# Altium PCB adau1979-fpga.PcbDoc (part 6 of 10)
Units mil, origin at the board's own origin, x right, y up, seen from the top; angles counter-clockwise.
Board outline 7874.02 x 9055.12 mil, 4 copper layers (Top Layer, GND, POWER, Bottom Layer), stack 23.756 mil thick; 636 components, 457 nets, 2015 pads, 4184 vias.
Unrouted connection lines stored in the file: 10.
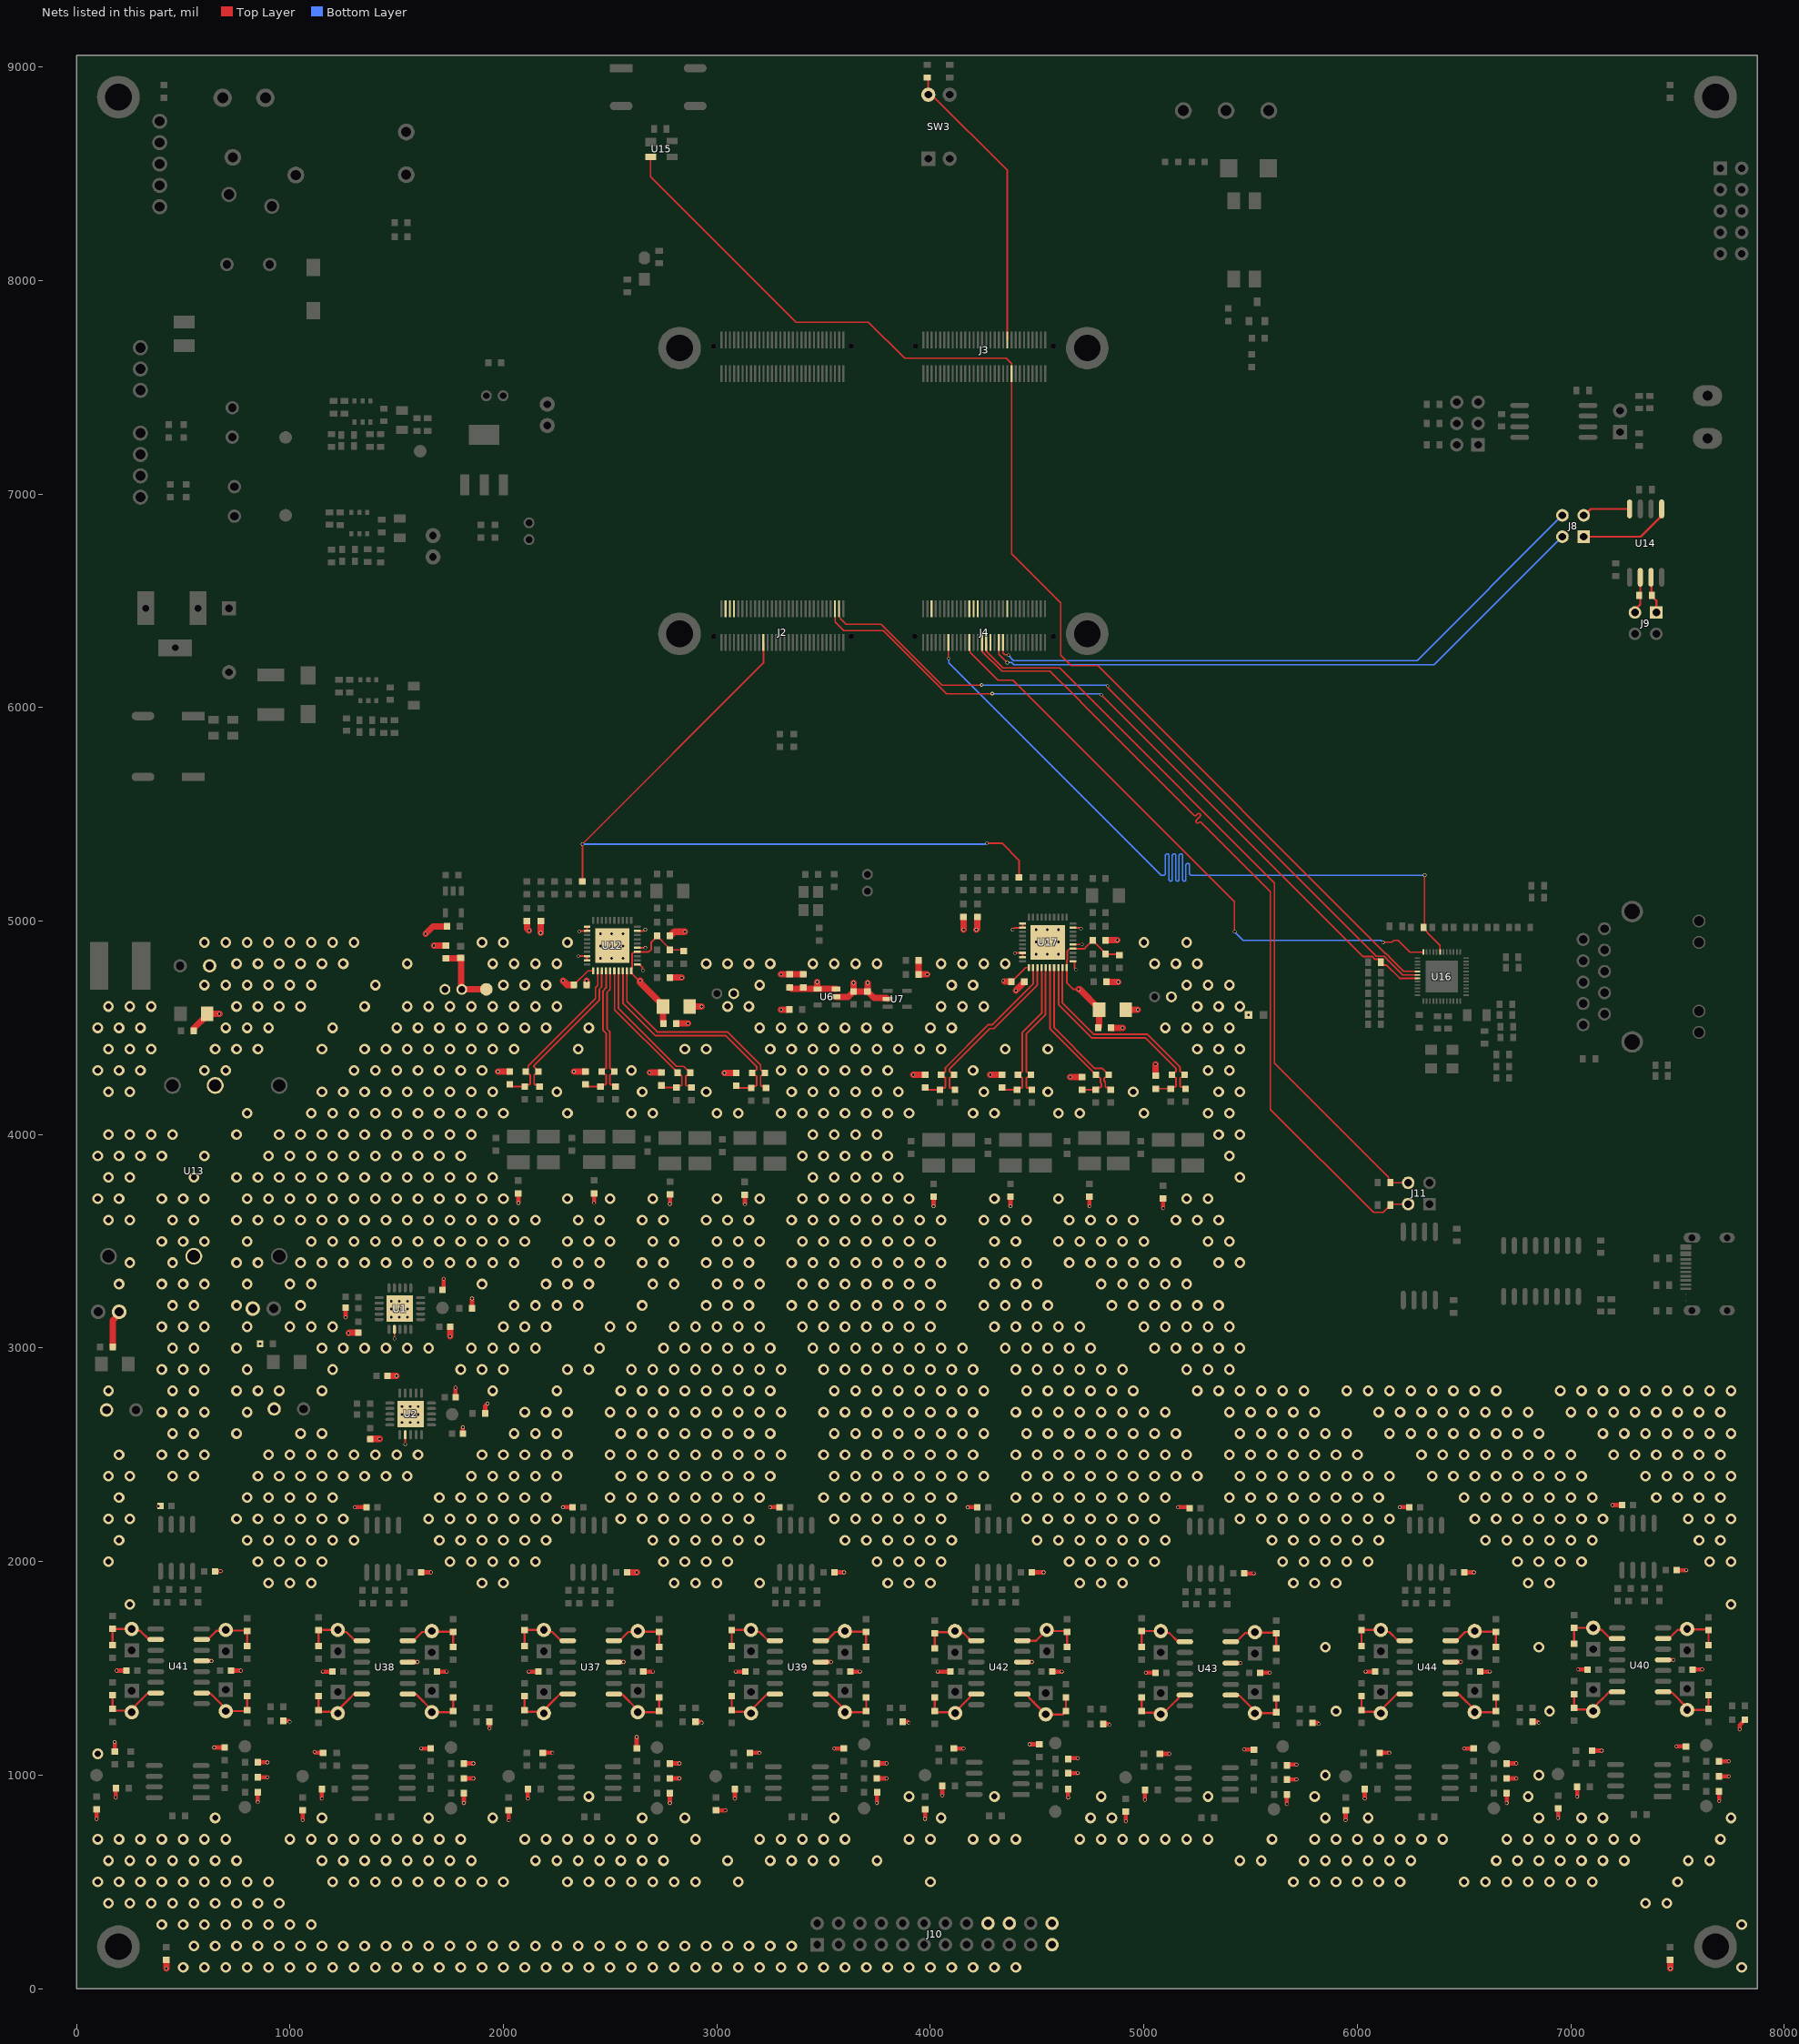
[diagram p5: the nets of this part, all layers, seen from the top]

## Via types
v1: diameter 50, hole 28, Top Layer to Bottom Layer, 3377 vias
v2: diameter 16, hole 12, Top Layer to Bottom Layer, 784 vias
v3: diameter 20, hole 12, Top Layer to Bottom Layer, 14 vias
v4: diameter 16, hole 8, Top Layer to Bottom Layer, 9 vias

## Nets (pads, with @x,y where several pads share a name; then routed paths per layer and width w, separated by ;. In a path a pad name is that pad's centre, name@x,y a point inside that pad or via, vN(x,y) a via of type N, cw(c..) or ccw(c..) an arc to the next point about the centre after c; other vN are vias at no path point) (continued)
AGND: C1.2 C2.2 C3.2 C5.2 C6.2 C7.2 C30.2 C31.1 C32.1 C33.1 C34.1 C35.1 C36.1 C39.1 C40.2 C41.1 C60.1 C61.2 C62.2 C63.1 C65.2 C66.1 C67.1 C68.1 C69.2 C70.2 C71.2 C72.1 C81.1 C82.1 C87.2 C88.2 C100.2 C112.2 C120.2 C121.1 C126.2 C131.2 C139.2 C140.2 C141.2 C142.2 C143.2 C144.2 C145.2 C146.2 C147.2 C148.2 C149.2 C150.2 C151.2 C152.2 C153.2 C154.2 C155.2 C156.1 C157.1 C158.1 C159.1 C160.1 C161.1 C162.1 C163.1 C164.1 C165.1 C166.1 C167.1 C168.1 C169.1 C170.1 C171.1 C180.1 C181.1 C182.1 C183.1 C184.1 C185.1 C186.1 C187.1 C188.1 C189.1 C190.1 C191.1 C192.1 C193.1 C194.1 C195.1 C196.1 C197.1 C198.1 C199.1 C200.1 C201.1 C202.1 C203.1 C204.1 C205.1 C206.1 C207.1 C208.1 C209.1 C210.1 C211.1 J10.18 J10.20 J10.23 J10.24 L6.1 R4.1 R6.1 R7.2 R8.2 R28.1 R29.1 R34.1 R35.1 R48.1 R50.1 R53.2 R54.1 R58.1 R59.1 R70.1 R71.1 R80.1 R85.1 R98.1 R100.1 R102.2 R103.1 R108.1 R109.1 R133.1 R134.2 R136.1 R137.1 R138.2 R140.2 R142.1 R143.1 R144.1 R145.2 R146.1 R147.2 R149.2 R153.2 R155.1 R156.2 R218.1 R228.1 R230.1 R232.1 R235.1 R236.1 R237.1 R243.1 R248.1 R254.1 R256.1 R258.1 R261.1 R263.1 R265.1 R267.1 U1.7 U1.21 U2.7 U2.21 U6.2 U7.2 U12.1 U12.5 U12.9 U12.21 U12.22 U12.28 U12.29 U12.41 U13.2 U13.5 U17.1 U17.5 U17.9 U17.21 U17.22 U17.28 U17.29 U17.41 U37.5 U38.5 U39.5 U40.5 U41.5 U42.5 U43.5 U44.5 | length 8180.4
  Top Layer w8: U1.7@1489.41,3087.81 1489.7,3087.51 1489.7,3045.3 v2(1490,3045) ; v2(1540,2550) U2.7@1540,2594.33 ; v2(2350,4835) 2350.4,4835.4 2390.9,4835.4 2391.9,4834.4 U12.29@2391.9,4814.7 ; v2(2355,4950) 2357.16,4950 2361.06,4953.9 U12.22@2391.9,4953.9 U12.21@2391.9,4973.6 ; U12.1@2628.1,4796.5 2638.35,4796.5 2652.57,4782.28 2652.57,4770.63 v2(2654.1,4769.1) ; U12.5@2628.1,4875.2 2628.2,4875.1 2664.9,4875.1 v2(2665,4875) ; U12.9@2628.1,4953.9 2656.74,4953.9 2662.84,4960 v2(2665,4960) ; v2(4385,4959.87) 4387.16,4959.87 4396.15,4968.85 4431.9,4968.85 U17.21@4431.9,4988.6 ; v2(4395,4850) 4395.4,4850.4 4431.5,4850.4 U17.28@4431.9,4850.8 U17.29@4431.9,4831.1 ; U17.9@4668.1,4968.9 4698.94,4968.9 4702.84,4965 v2(4705,4965) ; U17.5@4669.7,4890.1 4709.9,4890.1 v2(4710,4890) ; U17.1@4675,4810 4675,4781.36 4681.1,4775.26 v2(4681.1,4773.1)
  Top Layer w20: v2(95,794.92) R267.1@95,840 ; R155.1@179.41,1109.92 v2(179.41,1155) ; v2(184.48,894.92) C154.2@184.48,940 ; v2(188.73,1489.99) C202.1@233.81,1489.99 ; v2(384,2259.99) C194.1@393.81,2259.99 ; U41.5@587.11,1535 v2(632.18,1535) ; v2(645,1130) 645.08,1129.92 C169.1@694.41,1129.92 ; C195.1@650,1955 v2(675.59,1955) ; C203.1@725,1490 v2(770.08,1490) ; R153.2@849.25,990 v2(894.33,990) ; v2(849.33,874.92) C147.2@849.33,920 ; C168.1@849.33,1060 v2(894.41,1060) ; R243.1@969.92,1255 v2@994.25,1255 ; v2(1060,789.92) R261.1@1060,835 ; v2(1115,1110) 1120.08,1104.92 R146.1@1144.41,1104.92 ; v2(1149.48,889.92) C155.2@1149.48,935 ; v2(1153.73,1484.99) C198.1@1198.81,1484.99 ; v2(1260.58,3143.72) C2.2@1260.58,3188.8 ; v2(1304.92,2255) C188.1@1350,2255 ; U38.5@1552.11,1530 v2(1597.18,1530) ; v2(1615,1125) 1615.08,1124.92 C171.1@1659.41,1124.92 ; C189.1@1615,1950 v2(1660.08,1950) ; C199.1@1690,1485 v2(1735.08,1485) ; C3.2@1720,3280 v2(1720,3325.08) ; C7.2@1775.59,2770 v2(1775.59,2815.08) ; C6.2@1810,2600 v2(1810,2629.26) ; v2(1814.33,869.92) C148.2@1814.33,915 ; C170.1@1814.33,1055 v2(1859.41,1055) ; R156.2@1814.92,985 v2(1860,985) ; C67.1@1852.89,3186.86 v2(1852.89,3231.94) ; C62.2@1914.92,2695 1914.92,2700.67 1915,2700.75 1915,2730 v2(1925,2740) ; v2(1934.92,1219) R235.1@1934.92,1250 ; v2(2025,789.92) R263.1@2025,835 ; v2(2070,3680) R28.1@2070,3725.08 ; v2(2114.48,889.92) C152.2@2114.48,935 ; v2(2118.73,1484.99) C196.1@2163.81,1484.99 ; R143.1@2184.41,1104.92 v2(2229.48,1104.92) ; v2(2278.73,2254.99) C190.1@2323.81,2254.99 ; v2(2425,3680.08) R34.1@2425,3725.16 ; U37.5@2517.11,1530 v2(2562.18,1530) ; C167.1@2624.41,1124.92 2624.41,1170 v2(2624.41,1179) ; C197.1@2655,1485 v2(2700.08,1485) ; R147.2@2779.25,985 v2(2824.33,985) ; v2(2779.33,869.92) C144.2@2779.33,915 ; C166.1@2779.33,1055 v2(2824.41,1055) ; v2(2780,3675) R48.1@2780,3720.08 ; R236.1@2899.92,1250 v2@2924.25,1250 ; R265.1@2995,835 v2(3040.08,835) ; v2(3084.48,889.92) C153.2@3084.48,935 ; v2(3088.73,1484.99) C200.1@3133.81,1484.99 ; v2(3130.74,3673.62) R58.1@3130.74,3718.7 ; R144.1@3154.41,1104.92 v2(3199.48,1104.92) ; v2(3248.73,2254.99) C192.1@3293.81,2254.99 ; U39.5@3497.51,1530 v2(3535,1530) ; v2(3549.33,1124.92) C165.1@3594.41,1124.92 ; C193.1@3550,1950 v2(3595.08,1950) ; C201.1@3625,1485 v2(3670.08,1485) ; R149.2@3749.25,985 v2(3794.33,985) ; v2(3749.33,869.92) C145.2@3749.33,915 ; C164.1@3749.33,1055 v2(3794.41,1055) ; R237.1@3869.92,1250 v2@3894.25,1250 ; v2(3975,795) R254.1@3975,840.08 ; v2(4015,3665) R70.1@4015,3710.08 ; v2(4034.33,1485) C204.1@4079.41,1485 ; v2(4055.08,904.92) C146.2@4055.08,950 ; R133.1@4110,1124.92 v2(4155.08,1124.92) ; v2(4174.33,2255) C182.1@4219.41,2255 ; v2(4375,3665) R80.1@4375,3710.08 ; U42.5@4440.8,1530 v2(4475,1530) ; v2(4464.92,1144.92) C156.1@4510,1144.92 ; C183.1@4485,1950 v2(4530.08,1950) ; C205.1@4570.59,1485 v2(4615.67,1485) ; R134.2@4644.92,1010 v2(4690,1010) ; v2(4645,894.92) C140.2@4645,940 ; C157.1@4645,1080 v2(4690.08,1080) ; v2(4745,3665) R98.1@4745,3710.08 ; R228.1@4809.92,1240 v2@4834.25,1240 ; v2(4915,784.92) R248.1@4915,830 ; v2(5004.48,884.92) C149.2@5004.48,930 ; v2(5008.73,1479.99) C206.1@5053.81,1479.99 ; R136.1@5074.41,1099.92 v2(5119.48,1099.92) ; v2(5090,3655) R108.1@5090,3700.08 ; v2(5159.92,2255) C180.1@5205,2255 ; U43.5@5407.11,1525 v2(5452.19,1525) ; v2(5469.92,1119.92) C158.1@5515,1119.92 ; C181.1@5470,1945 v2(5515.08,1945) ; C207.1@5545,1480 v2(5590.08,1480) ; R138.2@5669.25,980 v2(5714.33,980) ; v2(5669.33,864.92) C141.2@5669.33,910 ; C159.1@5669.33,1050 v2(5714.41,1050) ; R218.1@5789.92,1245 v2@5814.25,1245 ; v2(5945,789.92) R256.1@5945,835 ; v2(6034.48,889.92) C150.2@6034.48,935 ; v2(6038.73,1484.99) C210.1@6083.81,1484.99 ; R137.1@6104.41,1104.92 v2(6149.48,1104.92) ; v2(6198.73,2254.99) C184.1@6243.81,2254.99 ; U44.5@6447.51,1530 v2(6485,1530) ; v2(6499.33,1124.92) C161.1@6544.41,1124.92 ; C185.1@6500,1950 v2(6545.08,1950) ; C211.1@6575,1485 v2(6620.08,1485) ; R140.2@6699.25,985 v2(6744.33,985) ; v2(6699.33,869.92) C142.2@6699.33,915 ; C160.1@6699.33,1055 v2(6744.41,1055) ; R230.1@6819.92,1250 v2@6844.25,1250 ; v2(6940,799.92) R258.1@6940,845 ; v2(7029.48,899.92) C151.2@7029.48,945 ; v2(7033.73,1494.99) C208.1@7078.81,1494.99 ; R142.1@7099.41,1114.92 v2(7144.48,1114.92) ; v2(7193.73,2264.99) C186.1@7238.81,2264.99 ; U40.5@7442.51,1540 v2(7480,1540) ; v2(7494.33,1134.92) C163.1@7539.41,1134.92 ; C187.1@7495,1960 v2(7540.08,1960) ; C209.1@7570,1495 v2(7615.08,1495) ; R145.2@7694.25,995 v2(7739.33,995) ; v2(7694.33,879.92) C143.2@7694.33,925 ; C162.1@7694.33,1065 v2(7739.41,1065) ; v2(7790,1215) 7790,1234.29 7814.92,1259.21 R232.1@7814.92,1260
  Top Layer w30: C68.1@169.92,3005 169.92,3129.4 200,3159.48 C65.2@200,3170 ; v2(420.76,95.08) R7.2@420.76,126.61 ; C71.2@549.92,4485 549.96,4485.04 549.96,4497.51 612.7,4560.25 C72.1@612.7,4565 v2(670,4565) ; v2(1275,3070) 1277.28,3072.28 R4.1@1320,3072.28 ; R6.1@1375,2574.41 1375.6,2575 v2(1420,2575) ; C5.2@1456.18,2870 v2(1500,2870) ; v2(1635,4940) 1670,4975 C39.1@1735.08,4975 ; v2(1674.92,4884.92) C41.1@1730,4884.92 ; v2(1750,3055) 1750,3099.41 C1.2@1750.59,3100 ; v2(1974.92,4294.92) R29.1@2030,4294.92 ; R53.2@2110,5000.08 2110.71,5000.08 2110.75,5000.04 2110.75,4964.25 v2(2120,4955) ; v2(2175,4945) R54.1@2175,5000.08 ; v2(2329.92,4295) R35.1@2385,4295 ; C66.1@2389.92,4700 v2(2389.92,4720) ; C191.1@2580,1950 v2(2625.08,1950) ; v2(2684.92,4289.92) R50.1@2740,4289.92 ; C87.2@2779.92,4735 v2(2835,4735) ; C100.2@2779.92,4930 2779.92,4930.71 2779.96,4930.75 2780.67,4930.75 2799.92,4950 v2(2850,4950) ; C81.1@2809.92,4520 v2(2865,4520) ; C82.1@2873,4600 v2(2928.08,4600) ; v2(3035.66,4288.54) R59.1@3090.74,4288.54 ; v2(3300,4749.92) C34.1@3331.54,4749.92 ; v2(3300.08,4585) C30.2@3331.61,4585 ; C34.1@3340,4749.92 C33.1@3405,4749.92 ; U6.2@3558.31,4645 3614.51,4645 3639.44,4669.92 C31.1@3705,4669.92 3705.71,4669.92 3735.28,4640.35 3794.23,4640.35 U7.2@3799.58,4635 ; C32.1@3640,4678.39 v2(3640,4709.92) ; C31.1@3705.71,4678.39 v2(3705.71,4709.92) ; v2(3919.92,4279.92) R71.1@3975,4279.92 ; C36.1@3944.92,4750 C35.1@3944.92,4815 ; C36.1@3953.39,4750 v2(3984.92,4750) ; v2(4155,4959.87) R102.2@4155,5020.04 ; v2(4215,4959.87) 4220,4964.87 R103.1@4220,5020.08 ; v2(4279.92,4279.92) R85.1@4335,4279.92 ; v2(4400,4675) 4400.63,4675 4439.92,4714.29 C112.2@4439.92,4715 ; v2(4654.92,4269.92) R100.1@4710,4269.92 ; C139.2@4819.92,4910 v2(4875,4910) ; C126.2@4824.92,4715 v2(4880,4715) ; C120.2@4844.92,4500 v2(4900,4500) ; C121.1@4915.7,4585 v2(4970.78,4585) ; R109.1@5055,4274.92 v2(5055,4330) ; v2(7465,95.08) R8.2@7465,126.61
  other v1: 500,100 600,100 700,100 800,100 900,100 1000,100 1100,100 1200,100 1300,100 1400,100 1500,100 1600,100 1700,100 1800,100 1900,100 2000,100 2100,100 2200,100 2300,100 2400,100 2500,100 2600,100 2700,100 2800,100 2900,100 3000,100 3100,100 3200,100 3300,100 3400,100 3500,100 3600,100 3700,100 3800,100 3900,100 4000,100 4100,100 4200,100 4300,100 4400,100 7800,100 550,200 650,200 750,200 850,200 950,200 1050,200 1150,200 1250,200 1350,200 1450,200 1550,200 1650,200 1750,200 1850,200 1950,200 2050,200 2150,200 2250,200 2350,200 2450,200 2550,200 2650,200 2750,200 2850,200 2950,200 3050,200 3150,200 3250,200 3350,200 400,300 500,300 600,300 700,300 800,300 900,300 1000,300 1100,300 7800,300 150,400 250,400 350,400 450,400 550,400 650,400 750,400 850,400 950,400 7350,400 7450,400 100,500 200,500 300,500 400,500 500,500 600,500 700,500 800,500 900,500 1200,500 1300,500 1400,500 1500,500 1600,500 1700,500 1800,500 1900,500 2000,500 2300,500 2400,500 2500,500 2600,500 2700,500 2800,500 2900,500 3100,500 4000,500 5700,500 5800,500 5900,500 6000,500 6100,500 6200,500 6500,500 6600,500 6700,500 6800,500 6900,500 7000,500 7100,500 7500,500 150,600 250,600 350,600 450,600 550,600 650,600 750,600 1150,600 1250,600 1350,600 1450,600 1550,600 1650,600 1750,600 1850,600 2150,600 2250,600 2350,600 2450,600 2550,600 2650,600 2750,600 3050,600 3250,600 3350,600 3450,600 3550,600 3750,600 5450,600 5550,600 5750,600 5850,600 5950,600 6050,600 6150,600 6250,600 6650,600 6750,600 6850,600 6950,600 7050,600 7150,600 7250,600 7550,600 7650,600 100,700 200,700 300,700 400,700 500,700 600,700 700,700 1000,700 1100,700 1200,700 1300,700 1400,700 1500,700 1600,700 1700,700 1800,700 2100,700 2200,700 2300,700 2400,700 2500,700 2600,700 2700,700 2900,700 3200,700 3300,700 3400,700 3500,700 3600,700 3900,700 4000,700 4200,700 4300,700 4400,700 4700,700 4800,700 4900,700 5000,700 5100,700 5200,700 5300,700 5600,700 5800,700 5900,700 6000,700 6100,700 6200,700 6300,700 6400,700 6700,700 6800,700 6900,700 7000,700 7100,700 7200,700 7300,700 7700,700 650,800 1150,800 1650,800 1950,800 2650,800 2850,800 3550,800 4050,800 4750,800 4850,800 5850,800 6050,800 6850,800 7050,800 7150,800 7750,800 2400,900 3900,900 4300,900 4800,900 5300,900 5800,900 6800,900 5850,1000 6850,1000 100,1100 5900,1300 6900,1300 5850,1600 6850,1600 250,1800 7750,1800 900,1900 1000,1900 1100,1900 1900,1900 2000,1900 2800,1900 2900,1900 3000,1900 3200,1900 3800,1900 3900,1900 4000,1900 4700,1900 4800,1900 4900,1900 5700,1900 5800,1900 5900,1900 6800,1900 6900,1900 150,2000 850,2000 950,2000 1050,2000 1150,2000 1750,2000 1850,2000 1950,2000 2050,2000 2150,2000 2750,2000 2850,2000 2950,2000 3050,2000 3750,2000 3850,2000 3950,2000 4050,2000 4650,2000 4750,2000 4850,2000 4950,2000 5050,2000 5650,2000 5750,2000 5850,2000 5950,2000 6050,2000 6750,2000 6850,2000 6950,2000 7050,2000 7650,2000 7750,2000 200,2100 800,2100 900,2100 1000,2100 1100,2100 1200,2100 1300,2100 1700,2100 1800,2100 1900,2100 2000,2100 2100,2100 2200,2100 2700,2100 2800,2100 2900,2100 3000,2100 3100,2100 3200,2100 3600,2100 3700,2100 3800,2100 3900,2100 4000,2100 4100,2100 4500,2100 4600,2100 4700,2100 4800,2100 4900,2100 5000,2100 5100,2100 5600,2100 5700,2100 5800,2100 5900,2100 6000,2100 6100,2100 6600,2100 6700,2100 6800,2100 6900,2100 7000,2100 7100,2100 7600,2100 7700,2100 150,2200 250,2200 750,2200 850,2200 950,2200 1050,2200 1150,2200 1250,2200 1650,2200 1750,2200 1850,2200 1950,2200 2050,2200 2150,2200 2250,2200 2550,2200 2650,2200 2750,2200 2850,2200 2950,2200 3050,2200 3150,2200 3550,2200 3650,2200 3750,2200 3850,2200 3950,2200 4050,2200 4450,2200 4550,2200 4650,2200 4750,2200 4850,2200 4950,2200 5050,2200 5450,2200 5550,2200 5650,2200 5750,2200 5850,2200 5950,2200 6050,2200 6150,2200 6550,2200 6650,2200 6750,2200 6850,2200 6950,2200 7050,2200 7150,2200 7550,2200 7650,2200 7750,2200 200,2300 800,2300 900,2300 1000,2300 1100,2300 1200,2300 1700,2300 1800,2300 1900,2300 2000,2300 2100,2300 2200,2300 2500,2300 2600,2300 2700,2300 2800,2300 2900,2300 3000,2300 3100,2300 3200,2300 3500,2300 3600,2300 3700,2300 3800,2300 3900,2300 4000,2300 4100,2300 4400,2300 4500,2300 4600,2300 4700,2300 4800,2300 4900,2300 5000,2300 5100,2300 5400,2300 5500,2300 5600,2300 5700,2300 5800,2300 5900,2300 6000,2300 6100,2300 6500,2300 6600,2300 6700,2300 6800,2300 6900,2300 7000,2300 7100,2300 7400,2300 7500,2300 7600,2300 7700,2300 150,2400 250,2400 450,2400 550,2400 850,2400 950,2400 1050,2400 1150,2400 1250,2400 1350,2400 1450,2400 1550,2400 1850,2400 1950,2400 2050,2400 2150,2400 2250,2400 2550,2400 2650,2400 2750,2400 2850,2400 2950,2400 3050,2400 3150,2400 3250,2400 3550,2400 3650,2400 3750,2400 3850,2400 3950,2400 4050,2400 4150,2400 4250,2400 4450,2400 4550,2400 4650,2400 4750,2400 4850,2400 4950,2400 5050,2400 5150,2400 5250,2400 5450,2400 5550,2400 5650,2400 5750,2400 5850,2400 5950,2400 6050,2400 6150,2400 6350,2400 6450,2400 6550,2400 6650,2400 6750,2400 6850,2400 6950,2400 7050,2400 7350,2400 7450,2400 7550,2400 7650,2400 7750,2400 200,2500 400,2500 500,2500 600,2500 900,2500 1000,2500 1100,2500 1200,2500 1300,2500 1400,2500 1500,2500 1600,2500 1900,2500 2000,2500 2100,2500 2200,2500 2300,2500 2500,2500 2600,2500 2700,2500 2800,2500 2900,2500 3000,2500 3100,2500 3200,2500 3300,2500 3500,2500 3600,2500 3700,2500 3800,2500 3900,2500 4000,2500 4100,2500 4200,2500 4400,2500 4500,2500 4600,2500 4700,2500 4800,2500 4900,2500 5000,2500 5100,2500 5200,2500 5400,2500 5500,2500 5600,2500 5700,2500 5800,2500 5900,2500 6000,2500 6300,2500 6400,2500 6500,2500 6600,2500 6700,2500 6800,2500 6900,2500 7000,2500 7200,2500 7300,2500 7400,2500 7500,2500 7600,2500 7700,2500 450,2600 550,2600 750,2600 1050,2600 1150,2600 2050,2600 2150,2600 2250,2600 2550,2600 2650,2600 2750,2600 2850,2600 2950,2600 3050,2600 3150,2600 3250,2600 3550,2600 3650,2600 3750,2600 3850,2600 3950,2600 4050,2600 4150,2600 4250,2600 4450,2600 4550,2600 4650,2600 4750,2600 4850,2600 4950,2600 5050,2600 5150,2600 5450,2600 5550,2600 5650,2600 5750,2600 5850,2600 5950,2600 6150,2600 6250,2600 6350,2600 6450,2600 6550,2600 6650,2600 6750,2600 6850,2600 7150,2600 7250,2600 7350,2600 7450,2600 7550,2600 7650,2600 7750,2600 400,2700 500,2700 600,2700 800,2700 2100,2700 2200,2700 2300,2700 2500,2700 2600,2700 2700,2700 2800,2700 2900,2700 3000,2700 3100,2700 3200,2700 3300,2700 3500,2700 3600,2700 3700,2700 3800,2700 3900,2700 4000,2700 4100,2700 4200,2700 4400,2700 4500,2700 4600,2700 4700,2700 4800,2700 4900,2700 5000,2700 5100,2700 5400,2700 5500,2700 5600,2700 5700,2700 5800,2700 6100,2700 6200,2700 6300,2700 6400,2700 6500,2700 6600,2700 6700,2700 6800,2700 7000,2700 7100,2700 7200,2700 7300,2700 7400,2700 7500,2700 7600,2700 7700,2700 150,2800 450,2800 550,2800 750,2800 850,2800 950,2800 1150,2800 1950,2800 2250,2800 2550,2800 2650,2800 2750,2800 2850,2800 2950,2800 3050,2800 3150,2800 3250,2800 3550,2800 3650,2800 3750,2800 3850,2800 3950,2800 4050,2800 4150,2800 4250,2800 4450,2800 4550,2800 4650,2800 4750,2800 4850,2800 4950,2800 5250,2800 5350,2800 5450,2800 5550,2800 5650,2800 5750,2800 5950,2800 6050,2800 6150,2800 6250,2800 6350,2800 6450,2800 6550,2800 6650,2800 6950,2800 7050,2800 7150,2800 7250,2800 7350,2800 7450,2800 7550,2800 7650,2800 7750,2800 400,2900 500,2900 600,2900 800,2900 1200,2900 1800,2900 1900,2900 2000,2900 2300,2900 2400,2900 2600,2900 2700,2900 2800,2900 2900,2900 3000,2900 3100,2900 3200,2900 3300,2900 3500,2900 3600,2900 3700,2900 3800,2900 3900,2900 4000,2900 4100,2900 4200,2900 4400,2900 4500,2900 4600,2900 4700,2900 4800,2900 4900,2900 5200,2900 5300,2900 5400,2900 450,3000 550,3000 750,3000 1150,3000 1250,3000 1350,3000 1450,3000 1550,3000 1650,3000 1850,3000 1950,3000 2050,3000 2150,3000 2450,3000 2750,3000 2850,3000 2950,3000 3050,3000 3150,3000 3250,3000 3450,3000 3550,3000 3650,3000 3750,3000 3850,3000 3950,3000 4050,3000 4150,3000 4350,3000 4450,3000 4550,3000 4650,3000 4750,3000 5050,3000 5150,3000 5250,3000 5350,3000 5450,3000 400,3100 500,3100 600,3100 800,3100 1000,3100 1100,3100 1200,3100 2000,3100 2100,3100 2200,3100 2500,3100 2600,3100 2800,3100 2900,3100 3000,3100 3100,3100 3200,3100 3400,3100 3500,3100 3600,3100 3700,3100 3800,3100 3900,3100 4000,3100 4300,3100 4400,3100 4500,3100 4600,3100 4700,3100 5000,3100 5100,3100 5200,3100 5300,3100 5400,3100 450,3200 550,3200 750,3200 1050,3200 2050,3200 2150,3200 2250,3200 2350,3200 2650,3200 2950,3200 3050,3200 3150,3200 3350,3200 3450,3200 3550,3200 3650,3200 3750,3200 3850,3200 3950,3200 4050,3200 4250,3200 4350,3200 4450,3200 4550,3200 4850,3200 4950,3200 5050,3200 5150,3200 5250,3200 5350,3200 200,3300 400,3300 500,3300 600,3300 800,3300 1000,3300 1100,3300 1900,3300 2200,3300 2300,3300 2400,3300 2700,3300 2800,3300 3000,3300 3100,3300 3200,3300 3400,3300 3500,3300 3600,3300 3700,3300 3800,3300 3900,3300 4000,3300 4300,3300 4400,3300 4500,3300 4800,3300 4900,3300 5000,3300 5100,3300 5200,3300 250,3400 450,3400 750,3400 850,3400 1050,3400 1150,3400 1250,3400 1350,3400 1450,3400 1550,3400 1650,3400 1750,3400 1850,3400 1950,3400 2050,3400 2250,3400 2350,3400 2450,3400 2650,3400 2750,3400 2950,3400 3050,3400 3150,3400 3350,3400 3450,3400 3550,3400 3650,3400 3750,3400 3850,3400 3950,3400 4050,3400 4250,3400 4350,3400 4450,3400 4650,3400 4750,3400 4850,3400 4950,3400 5050,3400 5150,3400 5350,3400 5450,3400 400,3500 500,3500 600,3500 800,3500 1100,3500 1200,3500 1300,3500 1400,3500 1500,3500 1600,3500 1700,3500 1800,3500 1900,3500 2000,3500 2100,3500 2300,3500 2400,3500 2500,3500 2700,3500 2800,3500 3000,3500 3100,3500 3200,3500 3400,3500 3500,3500 3600,3500 3700,3500 3800,3500 3900,3500 4000,3500 4300,3500 4400,3500 4600,3500 4700,3500 4800,3500 4900,3500 5000,3500 5300,3500 5400,3500 150,3600 250,3600 450,3600 550,3600 750,3600 850,3600 950,3600 1050,3600 1150,3600 1250,3600 1350,3600 1450,3600 1550,3600 1650,3600 1750,3600 1850,3600 1950,3600 2050,3600 2150,3600 2350,3600 2450,3600 2650,3600 2750,3600 2950,3600 3050,3600 3150,3600 3350,3600 3450,3600 3550,3600 3650,3600 3750,3600 3850,3600 3950,3600 4050,3600 4250,3600 4350,3600 4450,3600 4650,3600 4750,3600 4850,3600 4950,3600 5150,3600 5250,3600 5350,3600 100,3700 200,3700 400,3700 500,3700 600,3700 800,3700 900,3700 1000,3700 1100,3700 1200,3700 1300,3700 1400,3700 1500,3700 1600,3700 1700,3700 1800,3700 1900,3700 2000,3700 2300,3700 2500,3700 2700,3700 3000,3700 3200,3700 3400,3700 3500,3700 3600,3700 3700,3700 3800,3700 3900,3700 4300,3700 4600,3700 5200,3700 5300,3700 150,3800 250,3800 550,3800 750,3800 850,3800 950,3800 1050,3800 1150,3800 1250,3800 1350,3800 1450,3800 1550,3800 1650,3800 1750,3800 1850,3800 1950,3800 3450,3800 3550,3800 3650,3800 3750,3800 3850,3800 5450,3800 100,3900 200,3900 300,3900 400,3900 600,3900 900,3900 1000,3900 1100,3900 1200,3900 1300,3900 1400,3900 1500,3900 1600,3900 1700,3900 1800,3900 3400,3900 3500,3900 3600,3900 3700,3900 3800,3900 5400,3900 150,4000 250,4000 350,4000 450,4000 750,4000 950,4000 1050,4000 1150,4000 1250,4000 1350,4000 1450,4000 1550,4000 1650,4000 1750,4000 1850,4000 3450,4000 3550,4000 3650,4000 3750,4000 5350,4000 5450,4000 800,4100 1100,4100 1200,4100 1300,4100 1400,4100 1500,4100 1600,4100 1700,4100 1800,4100 1900,4100 2000,4100 2300,4100 2600,4100 2700,4100 3000,4100 3100,4100 3300,4100 3400,4100 3500,4100 3600,4100 3700,4100 3800,4100 3900,4100 4200,4100 4300,4100 4600,4100 4700,4100 5000,4100 5300,4100 5400,4100 150,4200 250,4200 1150,4200 1250,4200 1350,4200 1450,4200 1550,4200 1650,4200 1750,4200 1850,4200 1950,4200 2250,4200 2650,4200 2950,4200 3350,4200 3450,4200 3550,4200 3650,4200 3750,4200 3850,4200 4250,4200 4550,4200 4950,4200 5350,4200 5450,4200 100,4300 200,4300 300,4300 600,4300 700,4300 1300,4300 1400,4300 1500,4300 1600,4300 1700,4300 1800,4300 1900,4300 2600,4300 3300,4300 3400,4300 3500,4300 3600,4300 3700,4300 3800,4300 4200,4300 5300,4300 5400,4300 150,4400 250,4400 350,4400 650,4400 750,4400 850,4400 1150,4400 1350,4400 1450,4400 1550,4400 1650,4400 1750,4400 1850,4400 1950,4400 2050,4400 2350,4400 2850,4400 2950,4400 3250,4400 3350,4400 3450,4400 3550,4400 3650,4400 3750,4400 3850,4400 3950,4400 4050,4400 4350,4400 4550,4400 5250,4400 5350,4400 5450,4400 100,4500 200,4500 300,4500 700,4500 800,4500 900,4500 1200,4500 1500,4500 1600,4500 1700,4500 1800,4500 1900,4500 2000,4500 2100,4500 2200,4500 2400,4500 3200,4500 3300,4500 3400,4500 3500,4500 3600,4500 3700,4500 3800,4500 4000,4500 4100,4500 5100,4500 5200,4500 5300,4500 5400,4500 150,4600 250,4600 350,4600 750,4600 850,4600 950,4600 1050,4600 1350,4600 1550,4600 1650,4600 1750,4600 1850,4600 1950,4600 2050,4600 2150,4600 2250,4600 3050,4600 3150,4600 4050,4600 4150,4600 4250,4600 5250,4600 5350,4600 5450,4600 600,4700 700,4700 800,4700 900,4700 1000,4700 1100,4700 1400,4700 2000,4700 2100,4700 2200,4700 3200,4700 4100,4700 4200,4700 5200,4700 5300,4700 5400,4700 750,4800 850,4800 950,4800 1050,4800 1150,4800 1250,4800 1550,4800 1950,4800 2050,4800 2150,4800 2250,4800 2950,4800 3050,4800 3150,4800 3250,4800 3450,4800 3550,4800 3650,4800 3750,4800 4050,4800 4150,4800 4250,4800 4350,4800 5050,4800 5150,4800 5250,4800 600,4900 700,4900 800,4900 900,4900 1000,4900 1100,4900 1200,4900 1300,4900 1900,4900 2000,4900 2300,4900 5000,4900 5200,4900
  other v2: 4839.33,1234.92 5819.33,1239.92 2929.33,1244.92 3899.33,1244.92 6849.33,1244.92 999.33,1249.92 1525.59,2651.52 1563.09,2651.52 1600.59,2651.52 1525.59,2689.02 1563.09,2689.02 1600.59,2689.02 1525.59,2726.52 1563.09,2726.52 1600.59,2726.52 860.08,3020 1475,3145 1512.5,3145 1550,3145 1475,3182.5 1512.5,3182.5 1550,3182.5 1475,3220 1512.5,3220 1550,3220 5490,4560 2455,4825 2507.5,4825 2560,4825 4495,4845 4547.5,4845 4600,4845 2455,4882.5 2507.5,4882.5 2560,4882.5 4495,4902.5 4547.5,4902.5 4600,4902.5 2455,4940 2507.5,4940 2560,4940 4495,4960 4547.5,4960 4600,4960
AIN1_N: C59.2 R29.2 R32.2 U12.32 | length 786.4
  Top Layer w8: R29.2@2030,4235.08 2040.16,4224.92 R32.2@2100,4224.92 2108.02,4232.94 2121.31,4232.94 2126,4237.63 2126,4253.5 2126,4278.57 2121.31,4283.25 2116.04,4283.25 2105.08,4294.21 C59.2@2105.08,4295 2116.04,4305.96 2116.04,4321.04 2431.25,4636.25 2431.25,4687.97 2441.95,4698.67 2441.95,4744.7 2441.3,4745.35 2441.3,4766.7 U12.32@2441.1,4766.9
AIN1_P: C59.1 R33.2 U12.33 | length 712.6
  Top Layer w8: R33.2@2170,4224.92 2161.98,4232.94 2148.69,4232.94 2144,4237.63 2144,4260.96 2144,4278.57 2148.69,4283.25 2153.96,4283.25 2164.92,4294.21 C59.1@2164.92,4295 2164.92,4295.79 2143.5,4317.21 2143.5,4323.05 2449.25,4628.8 2449.25,4680.51 2459.95,4691.21 2459.95,4744.7 2460.6,4745.35 2460.6,4766.7 U12.33@2460.8,4766.9
AIN2_N: C74.2 R35.2 R39.2 U12.34 | length 669.2
  Top Layer w8: R35.2@2385,4235.16 2395.16,4225 R39.2@2455,4225 2463.02,4233.02 2476.31,4233.02 2481,4237.71 2481,4253.58 2481,4278.64 2476.31,4283.33 2471.04,4283.33 2460.08,4294.29 C74.2@2460.08,4295.08 ; C74.2@2460.08,4295.87 2471.04,4306.83 2476.31,4306.83 2481,4311.51 2481,4474.07 2467.25,4487.82 2467.25,4673.06 2481.3,4687.11 2481.3,4744.65 2480.6,4745.35 2480.6,4766.8 U12.34@2480.5,4766.9
AIN2_P: C74.1 R43.2 U12.35 | length 595.8
  Top Layer w8: U12.35@2500.1,4766.9 2500,4766.8 2500,4745.35 2499.3,4744.65 2499.3,4679.65 2485.25,4665.6 2485.25,4495.27 2499,4481.52 2499,4311.51 2503.69,4306.83 2508.96,4306.83 2519.92,4295.87 C74.1@2519.92,4295.08 2519.92,4294.29 2508.96,4283.33 2503.69,4283.33 2499,4278.64 2499,4261.03 2499,4237.71 2503.69,4233.02 2516.98,4233.02 R43.2@2525,4225
AIN3_N: C80.2 R50.2 R52.2 U12.36 | length 773.5
  Top Layer w8: U12.36@2519.8,4766.9 2520,4766.7 2520,4745.35 2520.65,4744.7 2520.65,4584.43 2803.33,4301.75 2804.12,4301.75 2815.08,4290.79 C80.2@2815.08,4290 ; R50.2@2740,4230.08 2750.16,4219.92 R52.2@2810,4219.92 2818.02,4227.94 2831.31,4227.94 2836,4232.63 2836,4248.5 2836,4273.57 2831.31,4278.25 2826.04,4278.25 C80.2@2815.08,4289.21
AIN3_P: C80.1 R55.2 U12.37 | length 737.5
  Top Layer w8: U12.37@2539.5,4766.9 2539.3,4766.7 2539.3,4745.35 2538.65,4744.7 2538.65,4591.88 2810.79,4319.75 2844.39,4319.75 2862.39,4301.75 2863.96,4301.75 2874.92,4290.79 2874.92,4289.21 2863.96,4278.25 2858.69,4278.25 2854,4273.57 2854,4255.96 2854,4232.63 2858.69,4227.94 2871.98,4227.94 R55.2@2880,4219.92
AIN4_N: C98.2 R59.2 R65.2 U12.38 | length 1117.4
  Top Layer w8: U12.38@2559.2,4766.9 2559.4,4766.7 2559.4,4745.35 2560.05,4744.7 2560.05,4615.64 2712.95,4462.75 3042.2,4462.75 3186.74,4318.21 3186.74,4305.06 3182.05,4300.37 3176.78,4300.37 3165.82,4289.41 C98.2@3165.82,4288.62 3165.82,4287.83 3176.78,4276.87 3182.05,4276.87 3186.74,4272.19 3186.74,4247.12 3186.74,4231.25 3182.05,4226.56 3168.76,4226.56 R65.2@3160.74,4218.54 3100.9,4218.54 R59.2@3090.74,4228.7
AIN4_P: C98.1 R67.2 U12.39 | length 1043.2
  Top Layer w8: U12.39@2578.9,4766.9 2578.7,4766.7 2578.7,4745.35 2578.05,4744.7 2578.05,4623.1 2720.4,4480.75 3049.66,4480.75 3204.74,4325.66 3204.74,4305.06 3209.42,4300.37 3214.7,4300.37 3225.66,4289.41 C98.1@3225.66,4288.62 3225.66,4287.83 3214.7,4276.87 3209.42,4276.87 3204.74,4272.19 3204.74,4254.58 3204.74,4231.25 3209.43,4226.56 3222.72,4226.56 R67.2@3230.74,4218.54
AIN5_N: C108.2 R71.2 R73.2 U17.32 | length 869
  Top Layer w8: R71.2@3975,4220.08 3985.16,4209.92 R73.2@4045,4209.92 4053.02,4217.94 4066.31,4217.94 4071,4222.63 4071,4238.5 4071,4263.57 4066.31,4268.25 4061.04,4268.25 4050.08,4279.21 C108.2@4050.08,4280 ; C108.2@4050.08,4280.79 4061.04,4291.75 4066.31,4291.75 4071,4296.43 4071,4314.21 4271.33,4514.55 4289.98,4514.55 4481.95,4706.52 4481.95,4759.7 4481.3,4760.35 4481.3,4781.7 U17.32@4481.1,4781.9
AIN5_P: C108.1 R76.2 U17.33 | length 795.5
  Top Layer w8: R76.2@4115,4209.92 4106.98,4217.94 4093.69,4217.94 4089,4222.63 4089,4245.96 4089,4263.57 4093.69,4268.25 4098.96,4268.25 4109.92,4279.21 C108.1@4109.92,4280 4109.92,4280.79 4098.96,4291.75 4093.69,4291.75 4089,4296.43 4089,4306.76 4278.79,4496.55 4297.43,4496.55 4499.95,4699.07 4499.95,4759.7 4500.6,4760.35 4500.6,4781.7 U17.33@4500.8,4781.9
AIN6_N: C115.2 R85.2 R88.2 U17.34 | length 725.2
  Top Layer w8: R85.2@4335,4220.08 4345.16,4209.92 R88.2@4405,4209.92 4413.02,4217.94 4426.31,4217.94 4431,4222.63 4431,4238.5 4431,4263.57 4426.31,4268.25 4421.04,4268.25 4410.08,4279.21 C115.2@4410.08,4280 ; C115.2@4410.08,4280.79 4421.04,4291.75 4426.31,4291.75 4431,4296.43 4431,4479.01 4521.3,4569.31 4521.3,4759.65 4520.6,4760.35 4520.6,4781.8 U17.34@4520.5,4781.9
AIN6_P: C115.1 R92.2 U17.35 | length 651.8
  Top Layer w8: R92.2@4475,4209.92 4466.98,4217.94 4453.69,4217.94 4449,4222.63 4449,4245.96 4449,4263.57 4453.69,4268.25 4458.96,4268.25 4469.92,4279.21 C115.1@4469.92,4280 4469.92,4280.79 4458.96,4291.75 4453.69,4291.75 4449,4296.43 4449,4471.55 4539.3,4561.85 4539.3,4759.65 4540,4760.35 4540,4781.8 U17.35@4540.1,4781.9
AIN7_N: C123.2 R100.2 R105.2 U17.36 | length 757.9
  Top Layer w8: U17.36@4559.8,4781.9 4560,4781.7 4560,4760.35 4560.65,4759.7 4560.65,4494.43 4763.33,4291.75 4764.12,4291.75 4775.08,4280.79 4775.08,4279.21 4786.04,4268.25 4791.31,4268.25 4796,4263.57 4796,4242.96 4801,4237.96 4801,4224.69 4796.31,4220 4785.08,4220 R105.2@4775,4209.92 4710.16,4209.92 R100.2@4710,4210.08
AIN7_P: C123.1 R107.2 U17.37 | length 730.3
  Top Layer w8: U17.37@4579.5,4781.9 4579.3,4781.7 4579.3,4760.35 4578.65,4759.7 4578.65,4501.88 4770.79,4309.75 4805.96,4309.75 4834.92,4280.79 4834.92,4279.21 4823.96,4268.25 4818.69,4268.25 4814,4263.57 4814,4250.41 4819,4245.41 4819,4224.69 4823.69,4220 4834.92,4220 R107.2@4845,4209.92
AIN8_N: C138.2 R109.2 R113.2 U17.38 | length 1055
  Top Layer w8: U17.38@4599.2,4781.9 4599.4,4781.7 4599.4,4760.35 4600.05,4759.7 4600.05,4609.07 4756.86,4452.25 5008.33,4452.25 5151,4309.59 5151,4296.43 5146.31,4291.75 5141.04,4291.75 5130.08,4280.79 C138.2@5130.08,4280 5130.08,4279.21 5141.04,4268.25 5146.31,4268.25 5151,4263.57 5151,4241 5151,4227.63 5146.31,4222.94 5133.02,4222.94 R113.2@5125,4214.92 5055.16,4214.92 R109.2@5055,4215.08
AIN8_P: C138.1 R122.2 U17.39 | length 984.9
  Top Layer w8: U17.39@4618.9,4781.9 4618.7,4781.7 4618.7,4760.35 4618.05,4759.7 4618.05,4616.52 4764.32,4470.25 5015.79,4470.25 5169,4317.04 5169,4296.43 5173.69,4291.75 5178.96,4291.75 5189.92,4280.79 C138.1@5189.92,4280 5189.92,4279.21 5178.96,4268.25 5173.69,4268.25 5169,4263.57 5169,4248.46 5169,4227.63 5173.69,4222.94 5186.98,4222.94 R122.2@5195,4214.92
AVDD: C33.2 C34.2 C40.1 C41.2 C66.2 C81.2 C82.2 C99.2 C100.1 C112.1 C120.1 C121.2 C136.2 C139.1 L5.2 R68.2 R119.2 T1.1 U6.3 U6.4 U12.4 U12.31 U12.40 U17.4 U17.31 U17.40 | length 2380.1
  Top Layer w8: C66.2@2330.08,4700 2330.08,4700.79 2396.19,4766.9 U12.31@2421.4,4766.9 ; v2(2640,4720) 2638.47,4721.53 2633.72,4721.53 2598.6,4756.65 U12.40@2598.6,4766.9 2598.6,4777.15 2602.35,4780.9 2602.35,4845.44 2610.91,4854 2626.6,4854 U12.4@2628.1,4855.5 2680.5,4855.5 2692.52,4867.52 2692.52,4901.65 C100.1@2720.08,4929.21 ; C100.1@2720.08,4930 C100.1@2720.08,4929.21 ; R68.2@2845,4859.92 2839.92,4865 C99.2@2779.92,4865 2768.96,4875.96 2768.96,4880.33 C100.1@2720.08,4929.21 ; v2(4340,4720) 4342.16,4720 v2@4346.38,4715.79 ; C112.1@4380.08,4715.79 4446.19,4781.9 U17.31@4461.4,4781.9 ; v2(4695,4680) 4670,4680 4638.6,4711.4 U17.40@4638.6,4781.9 4638.6,4813.06 4640.7,4815.16 4640.7,4858.79 4650.91,4869 4666.6,4869 U17.4@4668.1,4870.5 4721.37,4870.5 4760.08,4909.21 4808.96,4860.33 4808.96,4855.96 C136.2@4819.92,4845 4879.92,4845 R119.2@4885,4839.92
  Top Layer w30: C41.2@1730,4825.08 1796.33,4825.08 1798.75,4827.5 L5.2@1800,4827.5 1801.25,4827.5 1802,4826.75 1802,4683 C40.1@1805,4680 T1.1@1920,4680 ; v2(2280,4720) 2299.25,4700.75 2330.04,4700.75 2330.08,4700.71 C66.2@2330.08,4700 ; v2(2640,4720) 2640,4712.05 2747.3,4604.75 2747.3,4523.49 2750.08,4520.71 C81.2@2750.08,4520 ; C34.2@3340,4690.08 3340.71,4690.08 3348.39,4682.4 U6.4@3471.69,4682.4 ; v2(3470,4715) 3470,4684.09 U6.4@3471.69,4682.4 ; U6.3@3558.31,4682.4 U6.4@3471.69,4682.4 ; v2@4346.38,4715.79 C112.1@4380.08,4715.79 ; v2(4695,4680) 4699.75,4680 4790,4589.75 4790,4505.63 4785.08,4500.71 C120.1@4785.08,4500
B5: J4.23 J8.2 | length 2963.6
  Top Layer w6: J4.23@4320.31,6304.37 4320.15,6304.22 4320.15,6249.85 v2(4360,6210)
  Bottom Layer w6: v2(4360,6210) 4381.11,6210 4391.11,6200 6360,6200 J8.2@6960,6800
B7: J3.19 R23.2 SW3.4 | length 1393.2
  Top Layer w8: R23.2@3985,8950.47 3990,8945.47 SW3.4@3990,8870 4005.4,8870 4360.2,8515.21 4360.2,7810.2 J3.19@4360.2,7721.69
B17: J4.47 R74.2 U16.19 | length 3955.3
  Top Layer w6: v2(4084.09,6230) J4.47@4084.09,6304.37 ; v2(6315,5215) 6315,4975 R74.2@6310,4970 6310,4966.06 6326.69,4949.37 6326.69,4946.53 6387.07,4886.16 U16.19@6387.13,4854.47 U16.19@6387.13,4854.47
  Bottom Layer w6: v2(4084.09,6230) 4085.62,6228.47 4085.62,6209.38 4094.06,6200.94 4094.14,6200.94 4104.68,6190.4 4104.68,6190.32 5080,5215 5090,5215 5093,5215 ccw(c5093,5223) 5101,5223 5101,5307 cw(c5109,5307) 5117,5307 5117,5195 ccw(c5125,5195) 5133,5195 5133,5307 cw(c5141,5307) 5149,5307 5149,5195 ccw(c5157,5195) 5165,5195 5165,5307 cw(c5173,5307) 5181,5307 5181,5195 ccw(c5189,5195) 5197,5195 5197,5262.37 cw(c5205,5262.37) 5213,5262.37 5213,5223 ccw(c5221,5223) 5221,5215 5235,5215 5610,5215 5695,5215 5930,5215 v2(6315,5215)
B18: J4.37 U16.24 | length 2840.8
  Top Layer w6: J4.37@4182.52,6304.37 4182.52,6269.92 4187.28,6265.16 4187.28,6264.31 4187.28,6258.53 4317.08,6128.73 4386.27,6128.73 5070,5445 5349.29,5165.71 5425,5090 v2(5425,4950) ; v2(6120,4900) 6161.08,4900 6171.08,4910 6190,4910 6245.53,4854.47 U16.24@6308.39,4854.47
  Bottom Layer w6: v2(5425,4950) 5465,4910 6110,4910 v2(6120,4900)
B19: J2.54
B20: J2.56
BCLK: J2.39 R42.2 R89.2 | length 3630.7
  Top Layer w8: R42.2@2370,5184.92 v2(2370,5360) 3217.95,6207.95 J2.39@3217.95,6304.37 ; v2(4265,5365) 4334.54,5365 4415,5284.54 R89.2@4415,5204.92
  Bottom Layer w8: v2(2370,5360) 4257.84,5360 4262.84,5365 v2(4265,5365)
C01: JP9.2 R171.2 R172.1 U41.15 | length 313
  Top Layer w10: R172.1@169.41,1375.08 R171.2@169.41,1309.92 176.87,1302.46 251.95,1302.46 JP9.2@254.7,1299.7 ; JP9.2@259.41,1295 259.41,1309.05 276.77,1326.42 276.77,1326.77 298.03,1348.03 298.46,1348.03 306.37,1355.94 306.37,1356.37 333.33,1383.33 370.04,1383.33 U41.15@371.71,1385
C02: JP18.2 R189.2 R190.1 U41.10 | length 298.2
  Top Layer w10: R189.2@169.41,1609.92 R190.1@169.41,1685.08 169.45,1685.04 JP18.2@259.41,1685 268.68,1675.72 299.28,1675.72 338.34,1636.66 370.04,1636.66 U41.10@371.71,1635
C03: JP26.2 R209.2 R210.1 U41.2 | length 318.7
  Top Layer w10: U41.2@587.19,1385 589.81,1382.38 627.7,1382.38 699.45,1310.63 JP26.2@699.41,1300 ; JP26.2@699.41,1300 R209.2@799.41,1300 ; R209.2@799.45,1299.96 R210.1@799.45,1365.04
C04: JP33.2 R233.2 R234.1 U41.7 | length 303.1
  Top Layer w10: U41.7@587.11,1635 614.06,1635 654.66,1675.6 695.01,1675.6 JP33.2@699.41,1680 701.87,1677.54 796.95,1677.54 R234.1@799.41,1675.08 R233.2@799.41,1605
C5: J4.29 J11.4 R90.1 | length 3552.3
  Top Layer w6: J4.29@4261.26,6304.37 4262.18,6303.45 4262.18,6262.82 4340.27,6184.73 4605.27,6184.73 4650,6140 4752.5,6037.5 5611.5,5178.5 5611.5,4333.5 6146.03,3798.97 6146.03,3783.5 R90.1@6154.53,3775 6155.19,3774.34 J11.4@6237.78,3774.34
C6: J4.27
c7: J3.18 U15.2 U16.29 | length 5890.6
  Top Layer w6: U15.2@2690,8577.5 2690,8485 3370,7805 3710,7805 3880,7635 4355,7635 4379.89,7610.11 J3.18@4379.89,7564.21 4379.89,6720.11 4610,6490 4610,6245 4660,6195 4784.54,6195 6131.16,4848.38 6133.25,4848.38 6147.31,4834.32 6147.31,4832.24 6215.86,4763.68 6280.47,4763.68 U16.29@6280.53,4763.62
C8: J4.31 J11.2 R83.1 | length 3800
  Top Layer w6: J4.31@4241.57,6304.37 4242.49,6303.45 4242.49,6262.71 4334.47,6170.73 4559.27,6170.73 4677.5,6052.5 4730,6000 5232.5,5497.5 5234.62,5495.38 ccw(c5240.28,5501.04) 5245.94,5495.38 5251.96,5501.4 cw(c5257.62,5495.75) 5263.27,5501.4 cw(c5257.62,5495.75) 5263.27,5490.09 5245.93,5472.75 ccw(c5251.59,5467.09) 5245.93,5461.44 ccw(c5251.59,5467.09) 5257.25,5461.44 cw(c5262.91,5455.78) 5268.56,5461.44 5342.5,5387.5 5592.5,5137.5 5592.5,4117.5 6075,3635 6119.53,3635 R83.1@6154.53,3670 6158.87,3674.34 J11.2@6237.78,3674.34
C10: J2.4 U16.30 | length 3439.7
  Top Layer w6: J2.4@3572.28,6427.4 J2.4@3572.28,6461.85 ; J2.4@3577.05,6422.56 3577.05,6418.34 3605.39,6390 3770,6390 4055,6105 v4(4240,6105) ; v2(4830,6100) 4831.53,6098.47 4831.53,6091.05 6088.19,4834.38 6127.45,4834.38 6133.31,4828.53 6133.31,4826.44 6211.88,4747.87 U16.30@6280.53,4747.87
  Bottom Layer w6: v4(4240,6105) 4822.84,6105 4827.84,6100 v2(4830,6100)
C11: JP7.2 R165.2 R166.1 U38.15 | length 313
  Top Layer w10: R166.1@1134.41,1370.08 R165.2@1134.41,1304.92 1141.87,1297.46 1216.95,1297.46 JP7.2@1219.7,1294.7 ; JP7.2@1224.41,1290 1224.41,1304.05 1241.77,1321.42 1241.77,1321.77 1263.03,1343.03 1263.46,1343.03 1271.37,1350.94 1271.37,1351.37 1298.33,1378.33 1335.04,1378.33 U38.15@1336.71,1380
C11_!: J2.6 R86.1 U16.31 | length 3479.9
  Top Layer w6: J2.6@3552.6,6461.85 3553.52,6460.93 3553.52,6401.48 3595,6360 3779.75,6360 4074.75,6065 v4(4290,6065)
  Top Layer w8: v2(4800,6060) 6025.62,4834.38 6068.39,4834.38 6082.39,4820.38 6099.75,4820.38 6109.53,4810.6 R86.1@6109.53,4806.67 ; R86.1@6109.53,4802.73 6119.31,4792.95 6137.41,4792.95 6198.23,4732.13 U16.31@6280.53,4732.13
  Bottom Layer w6: v4(4290,6065) 4792.84,6065 4797.84,6060 v2(4800,6060)
C12: JP14.2 R181.2 R182.1 U38.10 | length 298.2
  Top Layer w10: R181.2@1134.41,1604.92 R182.1@1134.41,1680.08 1134.45,1680.04 JP14.2@1224.41,1680 1233.68,1670.72 1264.28,1670.72 1303.34,1631.66 1335.04,1631.66 U38.10@1336.71,1630
C13: JP22.2 R198.2 R199.1 U38.2 | length 318.7
  Top Layer w10: U38.2@1552.19,1380 1554.81,1377.38 1592.7,1377.38 1664.45,1305.63 JP22.2@1664.41,1295 ; JP22.2@1664.41,1295 R198.2@1764.41,1295 ; R198.2@1764.45,1294.96 R199.1@1764.45,1360.04
C13_1: J4.36
C14: JP30.2 R222.2 R223.1 U38.7 | length 303.1
  Top Layer w10: U38.7@1552.11,1630 1579.06,1630 1619.66,1670.6 1660.01,1670.6 JP30.2@1664.41,1675 1666.87,1672.54 1761.95,1672.54 R223.1@1764.41,1670.08 R222.2@1764.41,1600
C15_1: J4.38
C16_1: J4.34
C17_!: J4.20
C18: J4.56
C20: J2.58
C21: JP6.2 R167.2 R168.1 U37.15 | length 313
  Top Layer w10: R168.1@2099.41,1370.08 R167.2@2099.41,1304.92 2106.87,1297.46 2181.95,1297.46 JP6.2@2184.7,1294.7 ; JP6.2@2189.41,1290 2189.41,1304.05 2206.77,1321.42 2206.77,1321.77 2228.03,1343.03 2228.46,1343.03 2236.37,1350.94 2236.37,1351.37 2263.33,1378.33 2300.04,1378.33 U37.15@2301.71,1380
C22: JP15.2 R183.2 R184.1 U37.10 | length 298.2
  Top Layer w10: R183.2@2099.41,1604.92 R184.1@2099.41,1680.08 2099.45,1680.04 JP15.2@2189.41,1680 2198.68,1670.72 2229.28,1670.72 2268.34,1631.66 2300.04,1631.66 U37.10@2301.71,1630
C23: JP23.2 R200.2 R201.1 U37.2 | length 318.7
  Top Layer w10: U37.2@2517.19,1380 2519.81,1377.38 2557.7,1377.38 2629.45,1305.63 JP23.2@2629.41,1295 ; JP23.2@2629.41,1295 R200.2@2729.41,1295 ; R200.2@2729.45,1294.96 R201.1@2729.45,1360.04
C24: JP31.2 R224.2 R225.1 U37.7 | length 303.1
  Top Layer w10: U37.7@2517.11,1630 2544.06,1630 2584.66,1670.6 2625.01,1670.6 JP31.2@2629.41,1675 2631.87,1672.54 2726.95,1672.54 R225.1@2729.41,1670.08 R224.2@2729.41,1600
C31: JP8.2 R169.2 R170.1 U39.15 | length 313
  Top Layer w10: R170.1@3069.41,1370.08 R169.2@3069.41,1304.92 3076.87,1297.46 3151.95,1297.46 JP8.2@3154.7,1294.7 ; JP8.2@3159.41,1290 3159.41,1304.05 3176.77,1321.42 3176.77,1321.77 3198.03,1343.03 3198.46,1343.03 3206.37,1350.94 3206.37,1351.37 3233.33,1378.33 3270.04,1378.33 U39.15@3271.71,1380
C32: JP16.2 R185.2 R186.1 U39.10 | length 298.2
  Top Layer w10: R185.2@3069.41,1604.92 R186.1@3069.41,1680.08 3069.45,1680.04 JP16.2@3159.41,1680 3168.68,1670.72 3199.28,1670.72 3238.34,1631.66 3270.04,1631.66 U39.10@3271.71,1630
C33: JP24.2 R202.2 R203.1 U39.2 | length 318.7
  Top Layer w10: U39.2@3487.19,1380 3489.81,1377.38 3527.7,1377.38 3599.45,1305.63 JP24.2@3599.41,1295 ; JP24.2@3599.41,1295 R202.2@3699.41,1295 ; R202.2@3699.45,1294.96 R203.1@3699.45,1360.04
C34: JP32.2 R226.2 R227.1 U39.7 | length 303.1
  Top Layer w10: U39.7@3487.11,1630 3514.06,1630 3554.66,1670.6 3595.01,1670.6 JP32.2@3599.41,1675 3601.87,1672.54 3696.95,1672.54 R227.1@3699.41,1670.08 R226.2@3699.41,1600
C41: JP3.2 R159.2 R160.1 U42.15 | length 309.3
  Top Layer w10: R160.1@4020,1365.08 R159.2@4020,1299.92 4024.96,1294.96 4110.04,1294.96 4115,1290 4115,1294.92 4185.43,1365.35 4185.43,1373.67 4191.76,1380 U42.15@4215,1380
C42: JP11.2 R175.2 R176.1 U42.10 | length 287.9
  Top Layer w10: R175.2@4020,1594.92 R176.1@4020,1665 4025,1670 4110,1670 JP11.2@4115,1675 4124.27,1665.73 4154.27,1665.73 4190,1630 U42.10@4215,1630
C43: JP19.2 R191.2 R192.1 U42.2 | length 320.5
  Top Layer w10: U42.2@4430.4,1380 4453.64,1380 4459.97,1373.67 4459.97,1365.03 4468.15,1356.85 4468.47,1356.85 4484.2,1341.12 4484.2,1340.8 JP19.2@4540,1285 4619.29,1285 4634.21,1299.92 R191.2@4635,1299.92 R192.1@4635,1365.08
C44: JP27.2 R214.2 R215.1 U42.7 | length 304.6
  Top Layer w10: U42.7@4430.4,1630 4495,1630 JP27.2@4545,1680 4549.96,1675.04 4635.04,1675.04 R215.1@4640,1670.08 R214.2@4640,1599.92
C51: JP2.2 R157.2 R158.1 U43.15 | length 313.8
  Top Layer w10: R158.1@4989.41,1365.08 R157.2@4989.41,1299.92 4996.87,1292.46 5071.95,1292.46 JP2.2@5074.7,1289.7 ; JP2.2@5079.41,1289.7 JP2.2@5079.41,1285 5086.78,1285 5132.55,1330.77 5162.13,1360.35 5162.13,1368.67 5168.46,1375 U43.15@5191.71,1375
C52: JP10.2 R173.2 R174.1 U43.10 | length 298.2
  Top Layer w10: R173.2@4989.41,1599.92 R174.1@4989.41,1675.08 4989.45,1675.04 JP10.2@5079.41,1675 5088.68,1665.72 5119.28,1665.72 5158.34,1626.66 5190.04,1626.66 U43.10@5191.71,1625
C53: JP17.2 R187.2 R188.1 U43.2 | length 318.7
  Top Layer w10: U43.2@5407.19,1375 5409.81,1372.38 5447.7,1372.38 5519.45,1300.63 JP17.2@5519.41,1290 ; JP17.2@5519.41,1290 R187.2@5619.41,1290 ; R187.2@5619.45,1289.96 R188.1@5619.45,1355.04
C54: JP25.2 R206.2 R207.1 U43.7 | length 303.1
  Top Layer w10: U43.7@5407.11,1625 5434.06,1625 5474.66,1665.6 5515.01,1665.6 JP25.2@5519.41,1670 5521.87,1667.54 5616.95,1667.54 R207.1@5619.41,1665.08 R206.2@5619.41,1595
C61: JP4.2 R161.2 R162.1 U44.15 | length 313
  Top Layer w10: R162.1@6019.41,1370.08 R161.2@6019.41,1304.92 6026.87,1297.46 6101.95,1297.46 JP4.2@6104.7,1294.7 ; JP4.2@6109.41,1290 6109.41,1304.05 6126.77,1321.42 6126.77,1321.77 6148.03,1343.03 6148.46,1343.03 6156.37,1350.94 6156.37,1351.37 6183.33,1378.33 6220.04,1378.33 U44.15@6221.71,1380
C62: JP12.2 R177.2 R178.1 U44.10 | length 298.2
  Top Layer w10: R177.2@6019.41,1604.92 R178.1@6019.41,1680.08 6019.45,1680.04 JP12.2@6109.41,1680 6118.68,1670.72 6149.28,1670.72 6188.34,1631.66 6220.04,1631.66 U44.10@6221.71,1630
C63: JP20.2 R194.2 R195.1 U44.2 | length 318.7
  Top Layer w10: U44.2@6437.19,1380 6439.81,1377.38 6477.7,1377.38 6549.45,1305.63 JP20.2@6549.41,1295 ; JP20.2@6549.41,1295 R194.2@6649.41,1295 ; R194.2@6649.45,1294.96 R195.1@6649.45,1360.04
C64: JP28.2 R216.2 R217.1 U44.7 | length 303.1
  Top Layer w10: U44.7@6437.11,1630 6464.06,1630 6504.66,1670.6 6545.01,1670.6 JP28.2@6549.41,1675 6551.87,1672.54 6646.95,1672.54 R217.1@6649.41,1670.08 R216.2@6649.41,1600
C71: JP5.2 R163.2 R164.1 U40.15 | length 313
  Top Layer w10: R164.1@7014.41,1380.08 R163.2@7014.41,1314.92 7021.87,1307.46 7096.95,1307.46 JP5.2@7099.7,1304.7 ; JP5.2@7104.41,1300 7104.41,1314.05 7121.77,1331.42 7121.77,1331.77 7143.03,1353.03 7143.46,1353.03 7151.37,1360.94 7151.37,1361.37 7178.33,1388.33 7215.04,1388.33 U40.15@7216.71,1390
C72: JP13.2 R179.2 R180.1 U40.10 | length 298.2
  Top Layer w10: R179.2@7014.41,1614.92 R180.1@7014.41,1690.08 7014.45,1690.04 JP13.2@7104.41,1690 7113.68,1680.72 7144.28,1680.72 7183.34,1641.66 7215.04,1641.66 U40.10@7216.71,1640
C73: JP21.2 R196.2 R197.1 U40.2 | length 318.7
  Top Layer w10: U40.2@7432.19,1390 7434.81,1387.38 7472.7,1387.38 7544.45,1315.63 JP21.2@7544.41,1305 ; JP21.2@7544.41,1305 R196.2@7644.41,1305 ; R196.2@7644.45,1304.96 R197.1@7644.45,1370.04
C74: JP29.2 R219.2 R220.1 U40.7 | length 303.1
  Top Layer w10: U40.7@7432.11,1640 7459.06,1640 7499.66,1680.6 7540.01,1680.6 JP29.2@7544.41,1685 7546.87,1682.54 7641.95,1682.54 R220.1@7644.41,1680.08 R219.2@7644.41,1610
CAN_N: J9.3 R57.2 U14.6 | length 175.4
  Top Layer w10: J9.3@7300,6445 7300,6457.97 7325,6482.97 U14.6@7325,6610
CAN_P: J9.1 R57.1 U14.7 | length 175.4
  Top Layer w10: U14.7@7375,6610 7377.26,6607.74 7377.26,6523.33 7400,6500.59 J9.1@7400,6445
CAN_RX: J4.21 J8.4 | length 2965.2
  Top Layer w6: J4.21@4340,6304.37 4340,6256 4349.09,6246.91 4363.09,6246.91 v2(4365,6245)
  Bottom Layer w6: v2(4365,6245) 4365,6244.5 4389.5,6220 6280,6220 J8.4@6960,6900
CAN_RX1: J8.3 U14.4 | length 227.4
  Top Layer w10: J8.3@7060,6900 7062.97,6900 7092.97,6930 U14.4@7275,6930
CAN_TX1: J8.1 U14.1 | length 437.6
  Top Layer w10: J8.1@7060,6800 7327,6800 7425,6898 U14.1@7425,6930